# Altium PCB Tracker-NB-IOT-v1.1.PcbDoc (part 2 of 3)
Units mm, origin at the board's own origin, x right, y up, seen from the top; angles counter-clockwise.
Board outline 60 x 36.48 mm, 4 copper layers (Top Layer, Mid Layer 1, Mid Layer 2, Bottom Layer), stack 1.514 mm thick; 117 components, 86 nets, 443 pads, 352 vias.
Unrouted connection lines stored in the file: 3.
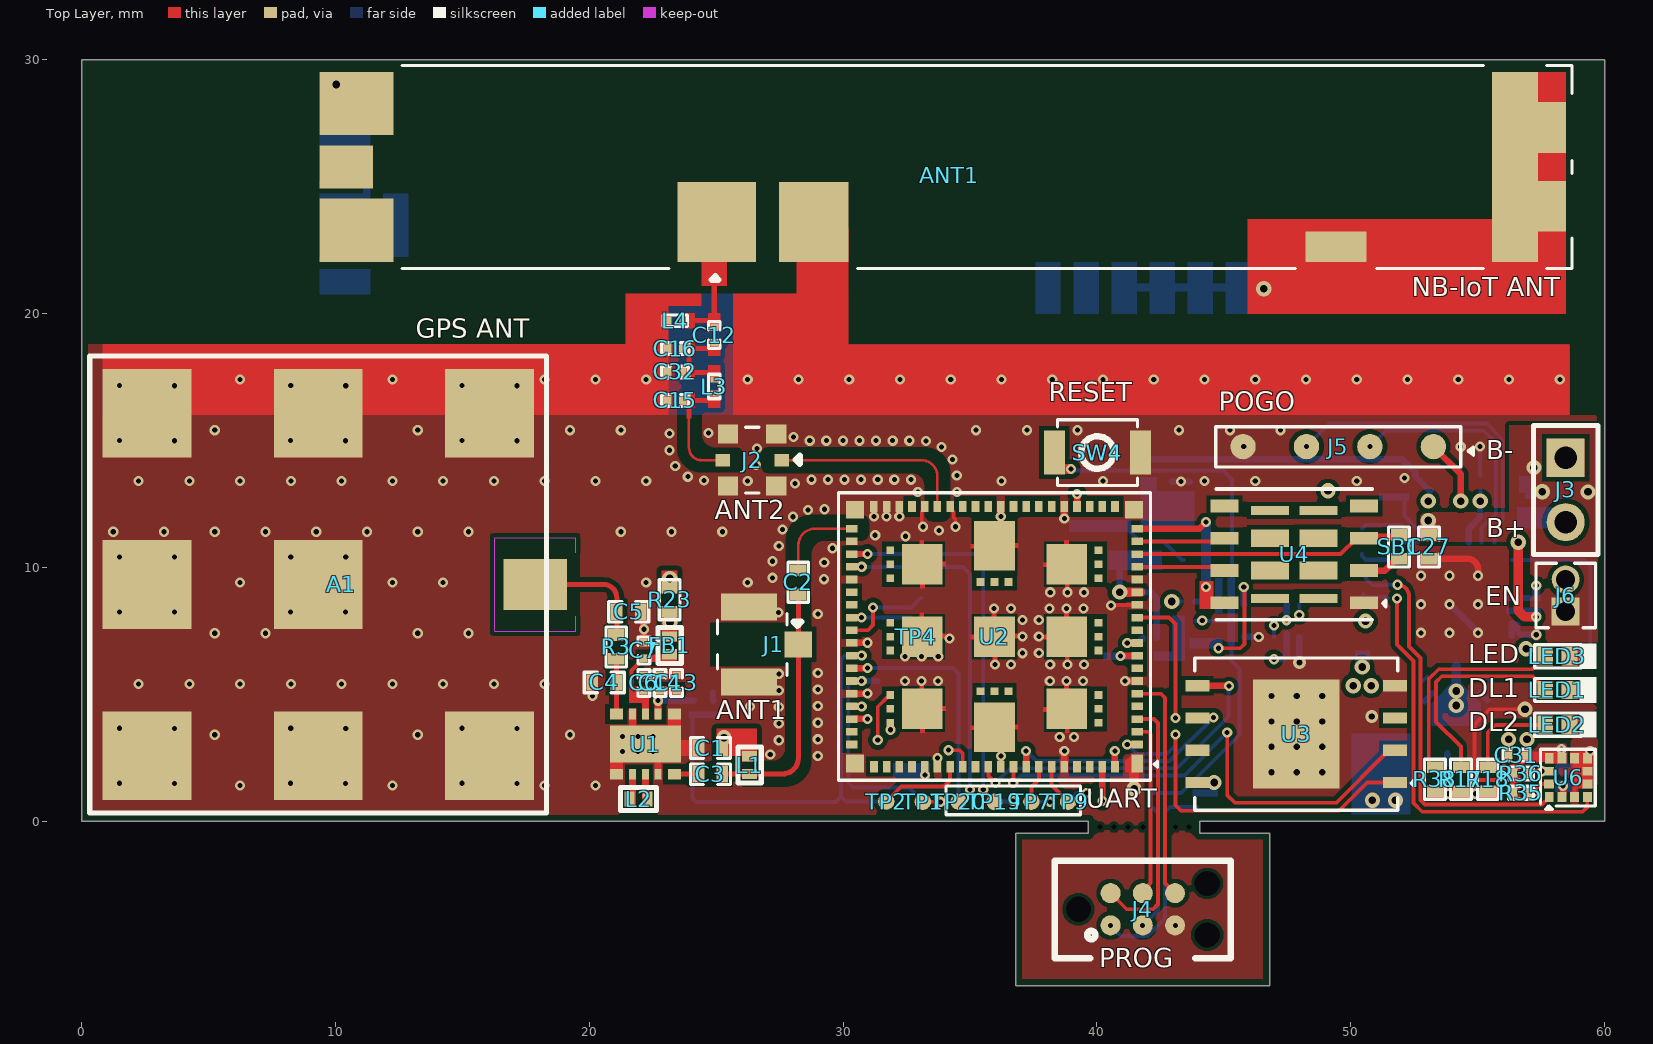
[diagram p0: Top Layer view]

## Part data (continued)
R4 R34: library part RC0201FR-07100KL, "RES 100K OHM 1% 1/20W 0201", Case Code (Imperial)=0201, Case Code (Metric)=0603, LCSC Part Number=C106224, Manufacturer=Yageo, Max Operating Temperature=125°C, Max Power Dissipation=50mW, Min Operating Temperature=-55°C, Package Quantity=10000, Resistance=100kR, Resistance Tolerance=1%, Resistor Type="Thick Film", Supplier Part Number 1=311-100KMCT-ND, Temperature Coefficient=200ppm/°C, Voltage Rating=25V, Case/Package=0201, Category="Chip SMD Resistors", ComponentLink1Description=https://datasheet.ciiva.com/7660/1421516-7660806.pdf?src-supplier=Element14, ComponentLink1URL=https://datasheet.ciiva.com/7660/1421516-7660806.pdf?src-supplier=Element14, ComponentLink2Description=https://datasheet.ciiva.com/22698/1563626-22698495.pdf?src-supplier=Element14, ComponentLink2URL=https://datasheet.ciiva.com/22698/1563626-22698495.pdf?src-supplier=Element14, ComponentLink3Description=https://datasheet.ciiva.com/46391/1421516-46391338.pdf?src-supplier=Element14, ComponentLink3URL=https://datasheet.ciiva.com/46391/1421516-46391338.pdf?src-supplier=Element14, ComponentLink4Description=https://datasheet.ciiva.com/2493/pyu-r-int-thick-7-2493770.pdf?src-supplier=Digi-Key, ComponentLink4URL=https://datasheet.ciiva.com/2493/pyu-r-int-thick-7-2493770.pdf?src-supplier=Digi-Key, ComponentLink5Description=https://datasheet.ciiva.com/2493/pyu-r-int-thick-7-2493771.pdf?src-supplier=Digi-Key, ComponentLink5URL=https://datasheet.ciiva.com/2493/pyu-r-int-thick-7-2493771.pdf?src-supplier=Digi-Key, ComponentLink6Description=https://datasheet.ciiva.com/2493/pyu-r-int-thick-7-2493769.pdf?src-supplier=Digi-Key, ComponentLink6URL=https://datasheet.ciiva.com/2493/pyu-r-int-thick-7-2493769.pdf?src-supplier=Digi-Key, ComponentLink7Description=https://datasheet.ciiva.com/26829/getdatasheetpartid-420441-26829850.pdf?src-supplier=Verical, ComponentLink7URL=https://datasheet.ciiva.com/26829/getdatasheetpartid-420441-26829850.pdf?src-supplier=Verical, Construction=Rectangular, Contact Plating=Tin,Matte, Depth=0.3mm, Features="Moisture Resistant", Height=0.01inch, Item Type=Resistor, Lead Free="Lead Free", Length=0.024inch, Manufacturer Part Number=RC0201FR-07100KL, Military Standard=Not, Number of Pins=2, Number of Terminations=2, Packaging="Tape and Reel", Power Rating=50mW, Pricing 1="1=0.10000, 10=0.03900, 100=0.01570, 1000=0.00705, 2500=0.00612, 5000=0.00506 (USD)", REACH SVHC="No SVHC", RoHS=Yes, RoHS Compliant=Yes, Series=RC, Size Code=0201, Stock 1=6740592, Supplier 1=Digi-Key, Termination=SMD/SMT, Tolerance=1%, Voltage Rating (DC)=25V, Width=0.012inch
R6 R7 R8 R9 R10 R11 R12 R13 R14 R24 R28 R33: library part RC0201JR-070RL, "RES SMD 0 OHM JUMPER 1/20W 0201", Case Code (Imperial)=0201, Case Code (Metric)=0603, LCSC Part Number=C106228, Manufacturer=Yageo, Max Operating Temperature=125°C, Max Power Dissipation=50mW, Min Operating Temperature=-55°C, Package Quantity=10000, Resistance Tolerance=5%, Resistor Type="Thick Film", Supplier Part Number 1=311-0.0NCT-ND, Voltage Rating=25V, Case/Package=0201, Category="Chip SMD Resistors", ComponentLink1Description=https://datasheet.ciiva.com/7672/1563626-7672247.pdf?src-supplier=Element14, ComponentLink1URL=https://datasheet.ciiva.com/7672/1563626-7672247.pdf?src-supplier=Element14, ComponentLink2Description=https://datasheet.ciiva.com/7660/1421516-7660808.pdf?src-supplier=Element14, ComponentLink2URL=https://datasheet.ciiva.com/7660/1421516-7660808.pdf?src-supplier=Element14, ComponentLink3Description=https://datasheet.ciiva.com/7672/1563626-7672248.pdf?src-supplier=Element14, ComponentLink3URL=https://datasheet.ciiva.com/7672/1563626-7672248.pdf?src-supplier=Element14, ComponentLink4Description=https://datasheet.ciiva.com/16855/pyu-rc0201-51-rohs-l-8-16855994.pdf?src-supplier=Avnet+Europe, ComponentLink4URL=https://datasheet.ciiva.com/16855/pyu-rc0201-51-rohs-l-8-16855994.pdf?src-supplier=Avnet+Europe, ComponentLink5Description=https://datasheet.ciiva.com/28419/pyu-rc0201-51-rohs-l-8-28419660.pdf?src-supplier=Avnet+Europe, ComponentLink5URL=https://datasheet.ciiva.com/28419/pyu-rc0201-51-rohs-l-8-28419660.pdf?src-supplier=Avnet+Europe, ComponentLink6Description=https://datasheet.ciiva.com/46391/1421516-46391340.pdf?src-supplier=Element14, ComponentLink6URL=https://datasheet.ciiva.com/46391/1421516-46391340.pdf?src-supplier=Element14, ComponentLink7Description=https://datasheet.ciiva.com/8896/pyu-rc0201-51-rohs-l-8-8896143.pdf?src-supplier=Avnet, ComponentLink7URL=https://datasheet.ciiva.com/8896/pyu-rc0201-51-rohs-l-8-8896143.pdf?src-supplier=Avnet, Construction=Rectangular, Contact Plating=Tin,Matte, Depth=0.3mm, Features="Moisture Resistant", Height=0.01inch, Lead Free="Lead Free", Length=0.6mm, Manufacturer Part Number=RC0201JR-070RL, Military Standard=Not, Number of Terminations=2, Packaging="Tape and Reel", Power Rating=50mW, Pricing 1="1=0.10000, 10=0.03600, 25=0.02640, 50=0.02000, 100=0.01480, 250=0.01128, 500=0.00904, 1000=0.00665, 5000=0.00477 (USD)", Radiation Hardening=No, REACH SVHC=Unknown, Resistance=0R, RoHS=Yes, RoHS Compliant=Yes, Series=RC, Size Code=0201, Stock 1=11079, Supplier 1=Digi-Key, Termination=SMD/SMT, Tolerance=5%, Voltage Rating (DC)=25V, Weight=6E-06oz, Width=0.012inch
R15 R19: library part RC0201FR-071KL, "RES 1K OHM 1% 1/20W 0201", Case Code (Imperial)=0201, Case Code (Metric)=0603, LCSC Part Number=C138165, Manufacturer=Yageo, Max Operating Temperature=125°C, Max Power Dissipation=50mW, Min Operating Temperature=-55°C, Package Quantity=10000, Resistance Tolerance=1%, Resistor Type="Thick Film", Supplier Part Number=311-1KMCT-ND, Temperature Coefficient=200ppm/°C, Voltage Rating=25V, Case/Package=0201, Category="Chip SMD Resistors", ComponentLink1Description=https://datasheet.ciiva.com/7672/1563626-7672204.pdf?src-supplier=Element14, ComponentLink1URL=https://datasheet.ciiva.com/7672/1563626-7672204.pdf?src-supplier=Element14, ComponentLink2Description=https://datasheet.ciiva.com/22698/1563626-22698505.pdf?src-supplier=Element14, ComponentLink2URL=https://datasheet.ciiva.com/22698/1563626-22698505.pdf?src-supplier=Element14, ComponentLink3Description=https://datasheet.ciiva.com/29721/pyu-r-int-thick-7-29721196.pdf?src-supplier=Digi-Key, ComponentLink3URL=https://datasheet.ciiva.com/29721/pyu-r-int-thick-7-29721196.pdf?src-supplier=Digi-Key, ComponentLink4Description=https://datasheet.ciiva.com/29721/pyu-r-int-thick-7-29721195.pdf?src-supplier=Digi-Key, ComponentLink4URL=https://datasheet.ciiva.com/29721/pyu-r-int-thick-7-29721195.pdf?src-supplier=Digi-Key, ComponentLink5Description=https://datasheet.ciiva.com/8896/pyu-rc0201-51-rohs-l-8-8896174.pdf?src-supplier=Avnet, ComponentLink5URL=https://datasheet.ciiva.com/8896/pyu-rc0201-51-rohs-l-8-8896174.pdf?src-supplier=Avnet, Construction=Rectangular, Contact Plating=Tin,Matte, Depth=0.3mm, Features="Moisture Resistant", Height=0.01inch, Item Type=Resistor, Lead Free=5697LeadFree, Length=0.024inch, Manufacturer Part Number=RC0201FR-071KL, Military Standard=Not, Number of Terminations=2, Packaging="Tape and Reel", Power Rating=50mW, Pricing="1=0.1, 10=0.027, 50=0.0172, 100=0.0143, 500=0.00988, 1000=0.00854, 5000=0.00629 (USD)", Reach SVHC Compliant=Unknown, RoHS=Yes, RoHS Compliant=Yes, Series=RC, Stock=5606340, Supplier=Digi-Key, Technology="THICK FILM", Termination=SMD/SMT, Tolerance=1%, Voltage Rating (DC)=25V, Width=0.012inch, Working Voltage=25V
R16: library part RC0402FR-070RL, "RES 0 OHM JUMPER 1/16W 0402", Case Code (Imperial)=0402, Case Code (Metric)=1005, LCSC Part Number=C106231, Manufacturer=Yageo, Max Operating Temperature=155°C, Max Power Dissipation=63mW, Min Operating Temperature=-55°C, Power Rating=62.5mW, Resistance=0R, Resistor Type="Thick Film", Supplier Part Number 1=603-RC0402FR-070RL, Temperature Coefficient=200ppm/°C, Tolerance=1%, Voltage Rating=50V, Case/Package=0402, ComponentLink1Description=https://datasheet.ciiva.com/8896/pyu-rc0402-51-rohs-l-6-8896149.pdf?src-supplier=Avnet, ComponentLink1URL=https://datasheet.ciiva.com/8896/pyu-rc0402-51-rohs-l-6-8896149.pdf?src-supplier=Avnet, ComponentLink2Description=https://datasheet.ciiva.com/16790/pyu-rc0402-51-rohs-l-6-r-16790444.pdf?src-supplier=Future+Electronics, ComponentLink2URL=https://datasheet.ciiva.com/16790/pyu-rc0402-51-rohs-l-6-r-16790444.pdf?src-supplier=Future+Electronics, Contact Plating=Tin,Matte, Features="Moisture Resistant", Height=0.35mm, Item Type=Resistors, Lead Free="Lead Free", Length=1mm, Manufacturer Part Number=RC0402FR-070RL, Mount="Surface Mount", Number of Terminations=2, Packaging="Tape and Reel", Pricing 1="1=0.10000, 10=0.01400, 50=0.01400, 100=0.00600, 1000=0.00300, 5000=0.00200, 10000=0.00100 (USD)", Radiation Hardening=No, RoHS=Yes, RoHS Compliant=Yes, Series=RC, Size Code=0402, Stock 1=8556842, Supplier 1=Mouser, Termination=SMD/SMT, Width=0.5mm
R17 R18 R38: library part RC0402FR-07120RL, "RES 120 OHM 1% 1/16W 0402", Case Code (Imperial)=0402, Case Code (Metric)=1005, LCSC Part Number=C114758, Manufacturer=Yageo, Max Operating Temperature=155°C, Max Power Dissipation=63mW, Min Operating Temperature=-55°C, Package Quantity=1, Power Rating=62.5mW, Resistance Tolerance=1%, Resistor Type="Thick Film", Supplier Part Number=4529079, Temperature Coefficient=100ppm/°C, Voltage Rating=50V, Case/Package=0402, ComponentLink1Description=https://datasheet.ciiva.com/12667/pyu-rc0402-51-rohs-l-6-r-12667958.pdf?src-supplier=Mouser, ComponentLink1URL=https://datasheet.ciiva.com/12667/pyu-rc0402-51-rohs-l-6-r-12667958.pdf?src-supplier=Mouser, ComponentLink2Description=https://datasheet.ciiva.com/7849/1018594-7849831.pdf?src-supplier=Element14, ComponentLink2URL=https://datasheet.ciiva.com/7849/1018594-7849831.pdf?src-supplier=Element14, Construction=Rectangular, Depth=0.5mm, Features="Moisture Resistant", Height=0.016inch, Item Type=Resistors, Lead Free=5697LeadFree, Length=0.039inch, Manufacturer Part Number=RC0402FR-07120RL, Military Standard=Not, Number of Terminations=2, Packaging="Tape and Reel", Pricing="10000=0.0012, 100000=0.0011, 300000=0.001, 750000=0.001, 2000000=0.0009 (USD)", Reach SVHC Compliant=No, RoHS=Yes, RoHS Compliant=Yes, Series=RC, Stock=150000, Supplier="Future Electronics", Technology="THICK FILM", Termination=SMD/SMT, Tolerance=1%, Voltage Rating (AC)=50V, Width=0.02inch
R21 R22: library part RC0201FR-071ML, "RES 1M OHM 1% 1/20W 0201", Case Code (Imperial)=0201, Case Code (Metric)=0603, LCSC Part Number=C295786, Manufacturer=Yageo, Max Operating Temperature=125°C, Max Power Dissipation=50mW, Min Operating Temperature=-55°C, Package Quantity=10000, Resistance Tolerance=1%, Resistor Type="Thick Film", Temperature Coefficient=200ppm/°C, Voltage Rating=25V, Case/Package=0201, ComponentLink1Description=https://datasheet.ciiva.com/29721/pyu-r-int-thick-7-29721005.pdf?src-supplier=Digikey, ComponentLink1URL=https://datasheet.ciiva.com/29721/pyu-r-int-thick-7-29721005.pdf?src-supplier=Digikey, ComponentLink2Description=https://datasheet.ciiva.com/29721/pyu-r-int-thick-7-29721006.pdf?src-supplier=Digikey, ComponentLink2URL=https://datasheet.ciiva.com/29721/pyu-r-int-thick-7-29721006.pdf?src-supplier=Digikey, ComponentLink3Description=https://datasheet.ciiva.com/7672/1563626-7672207.pdf?src-supplier=Element14, ComponentLink3URL=https://datasheet.ciiva.com/7672/1563626-7672207.pdf?src-supplier=Element14, ComponentLink4Description=https://datasheet.ciiva.com/22698/1563626-22698507.pdf?src-supplier=Element14, ComponentLink4URL=https://datasheet.ciiva.com/22698/1563626-22698507.pdf?src-supplier=Element14, ComponentLink5Description=https://datasheet.ciiva.com/25647/pyu-r-int-thick-7-25647311.pdf?src-supplier=Digikey, ComponentLink5URL=https://datasheet.ciiva.com/25647/pyu-r-int-thick-7-25647311.pdf?src-supplier=Digikey, Construction=Rectangular, Contact Plating=Tin,Matte, Depth=0.3mm, Features="Moisture Resistant", Height=0.01inch, Item Type=Resistor, Lead Free=5697LeadFree, Length=0.6mm, Manufacturer Part Number=RC0201FR-071ML, Military Standard=Not, Number of Terminations=2, Packaging="Tape and Reel", Power Rating=50mW, Pricing="1=0.104, 25=0.016, 100=0.008, 250=0.007, 1000=0.006 (USD)", Reach SVHC Compliant=Unknown, RoHS=Yes, RoHS Compliant=Yes, Series=RC, Stock=13025, Supplier=Avnet, Termination=SMD/SMT, Tolerance=1%, Voltage Rating (DC)=25V, Width=0.3mm
R29: library part RT0402BRE0747KL, "RES SMD 47K OHM 0.1% 1/16W 0402", Case Code (Metric)=3668CaseCodeMetric, Case/Package=0402, LCSC Part Number=C853293, Manufacturer=Yageo, Max Operating Temperature=155°C, Max Power Dissipation=63mW, Min Operating Temperature=-55°C, Power Rating=62.5mW, Supplier Part Number=YAG4391CT-ND, Temperature Coefficient=50ppm/°C, Tolerance=0.1%, Voltage Rating=50V, Category="Chip SMD Resistors", ComponentLink1Description=https://datasheet.octopart.com/RT0402BRE0747KL-Yageo-datasheet-169971040.pdf?src-supplier=Future+Electronics, ComponentLink1URL=https://datasheet.octopart.com/RT0402BRE0747KL-Yageo-datasheet-169971040.pdf?src-supplier=Future+Electronics, ComponentLink2Description=http://www.yageo.com/documents/recent/PYu-RT_1-to-0.01_RoHS_L_9.pdf?src-supplier=Digikey, ComponentLink2URL=http://www.yageo.com/documents/recent/PYu-RT_1-to-0.01_RoHS_L_9.pdf?src-supplier=Digikey, ComponentLink3Description=https://www.yageo.com/upload/media/product/productsearch/datasheet/rchip/PYu-RT_1-to-0.01_RoHS_L_12.pdf?src-supplier=Digikey, ComponentLink3URL=https://www.yageo.com/upload/media/product/productsearch/datasheet/rchip/PYu-RT_1-to-0.01_RoHS_L_12.pdf?src-supplier=Digikey, Height=350um, Item Type=Resistor, Lead Free="Lead Free", Length=1mm, Manufacturer Part Number=RT0402BRE0747KL, Number of Terminations=2, Pricing="1=0.16, 10=0.121, 50=0.0958, 100=0.0858, 500=0.06536, 1000=0.05776, 5000=0.0428 (USD)", RoHS=Yes, RoHS Compliant=Yes, Series=RT, Stock=11654, Supplier=Digikey, Voltage Rating (DC)=50V, Width=500um
R30: library part RT0402BRD07150KL, "RES 150K OHM 0.1% 1/16W 0402", LCSC Part Number=C852538, Manufacturer=Yageo, Supplier Part Number=3102901, Category="Chip SMD Resistors", Item Type=Resistor, Manufacturer Part Number=RT0402BRD07150KL, Pricing="10000=0.0218, 20000=0.0213, 30000=0.021, 50000=0.0206, 100000=0.0199 (USD)", RoHS=Yes, RoHS Compliant=Yes, Stock=20000, Supplier="Future Electronics"
R31 R32 R35 R36: library part RC0201FR-074K7L, "RES 4.7K OHM 1% 1/20W 0201", LCSC Part Number=C138135, Manufacturer=Yageo, Supplier Part Number=7537285, Category="Chip SMD Resistors", ComponentLink1Description=https://datasheet.ciiva.com/2493/pyu-r-int-thick-7-2493811.pdf?src-supplier=Digi-Key, ComponentLink1URL=https://datasheet.ciiva.com/2493/pyu-r-int-thick-7-2493811.pdf?src-supplier=Digi-Key, ComponentLink2Description=https://datasheet.ciiva.com/2493/pyu-r-int-thick-7-2493812.pdf?src-supplier=Digi-Key, ComponentLink2URL=https://datasheet.ciiva.com/2493/pyu-r-int-thick-7-2493812.pdf?src-supplier=Digi-Key, ComponentLink3Description=https://datasheet.ciiva.com/2493/pyu-r-int-thick-7-2493813.pdf?src-supplier=Digi-Key, ComponentLink3URL=https://datasheet.ciiva.com/2493/pyu-r-int-thick-7-2493813.pdf?src-supplier=Digi-Key, ComponentLink4Description=https://datasheet.ciiva.com/8892/pyu-rc0201-51-rohs-l-8-8892942.pdf?src-supplier=Avnet, ComponentLink4URL=https://datasheet.ciiva.com/8892/pyu-rc0201-51-rohs-l-8-8892942.pdf?src-supplier=Avnet, ComponentLink5Description=https://datasheet.ciiva.com/7672/1563626-7672233.pdf?src-supplier=Element14, ComponentLink5URL=https://datasheet.ciiva.com/7672/1563626-7672233.pdf?src-supplier=Element14, Item Type=Resistor, Manufacturer Part Number=RC0201FR-074K7L, Pricing="10000=0.0014, 50000=0.0013, 250000=0.0013, 750000=0.0012, 2000000=0.0011 (USD)", RoHS=Yes, Stock=1610000, Supplier="Future Electronics"
SB1: "Solder Bridge ON", Item Type="Solder Bridge", Manufacturer Part Number="Solder Bridge 0402"
SW4: "SWITCH TACTILE SPST-NO 0.05A 12V", Contact Current Rating=50mA, Contact Resistance=100mR, Insulation Resistance=100MR, LCSC Part Number=C231329, Manufacturer=Omron, Max Operating Temperature=70°C, Max Voltage Rating (DC)=12V, Min Operating Temperature=-25°C, Operating Force=1.5N, Package Quantity=1, Ratings="Dust Proof,IP40", Supplier Part Number 1=SW1020DKR-ND, Actuator Length=0.4mm, Actuator Type=Standard, ComponentLink1Description=http://www.farnell.com/datasheets/60838.pdf?src-supplier=Farnell, ComponentLink1URL=http://www.farnell.com/datasheets/60838.pdf?src-supplier=Farnell, ComponentLink2Description=http://www.farnell.com/datasheets/60838.pdf?src-supplier=Element14, ComponentLink2URL=http://www.farnell.com/datasheets/60838.pdf?src-supplier=Element14, ComponentLink3Description=https://omronfs.omron.com/en_US/ecb/products/pdf/en-b3u.pdf?src-supplier=Digi-Key, ComponentLink3URL=https://omronfs.omron.com/en_US/ecb/products/pdf/en-b3u.pdf?src-supplier=Digi-Key, ComponentLink4Description=http://www.omron.com/ecb/products/pdf/en-b3u.pdf?src-supplier=Digi-Key, ComponentLink4URL=http://www.omron.com/ecb/products/pdf/en-b3u.pdf?src-supplier=Digi-Key, ComponentLink5Description=https://www.distrelec.biz/Web/Downloads/he/et/B3U_eng_datasheet.pdf?mime=application%2Fpdf&src-supplier=Distrelec, ComponentLink5URL=https://www.distrelec.biz/Web/Downloads/he/et/B3U_eng_datasheet.pdf?mime=application%2Fpdf&src-supplier=Distrelec, ComponentLink6Description=http://www.onlinecomponents.com/productFiles/mf-OM/en-b3u.pdf?src-supplier=Onlinecomponents.com, ComponentLink6URL=http://www.onlinecomponents.com/productFiles/mf-OM/en-b3u.pdf?src-supplier=Onlinecomponents.com, ComponentLink7Description=https://www.verical.com/server-webapp/html/getDatasheet?partID=552554&src-supplier=Verical, ComponentLink7URL=https://www.verical.com/server-webapp/html/getDatasheet?partID=552554&src-supplier=Verical, ComponentLink8Description=http://www.farnell.com/datasheets/1685550.pdf?src-supplier=Element14, ComponentLink8URL=http://www.farnell.com/datasheets/1685550.pdf?src-supplier=Element14, ComponentLink9Description=http://www.farnell.com/datasheets/2610940.pdf?src-supplier=Farnell, ComponentLink9URL=http://www.farnell.com/datasheets/2610940.pdf?src-supplier=Farnell, ComponentLink10Description=https://www.alliedelec.com/m/d/4c8a9ef82804fc3c241a13c1e298fd73.pdf?src-supplier=Allied+Electronics, ComponentLink10URL=https://www.alliedelec.com/m/d/4c8a9ef82804fc3c241a13c1e298fd73.pdf?src-supplier=Allied+Electronics, Contact Material=Silver, Current Rating=50mA, Depth=2.5mm, Electrical Life=200000Cycles, Height=1.2mm, Illumination Type=Non-Illuminated,Illuminated, Item Type=Switch, Lead Free="Lead Free", Length=4mm, Manufacturer Part Number=B3U-1000P, Max Current Rating=50mA, Mechanical Life=200000Cycles, Mount="Surface Mount", Orientation=Straight, Packaging="Tape and Reel", Pricing 1="1=1, 10=0.961, 25=0.9064, 50=0.7976, 100=0.7251, 250=0.68888, 500=0.67074, 1000=0.52571 (USD)", REACH SVHC=Unknown, Stock 1=116454, Supplier 1=Digi-Key, Switch Function=Off-Mom, Switch Travel=0.15mm, Termination=SMD/SMT, Throw Configuration=SPST, Voltage Rating (DC)=12V, Weight=0.000776oz, Width=3mm
TP1 TP2 TP3 TP4 TP5 TP6 TP7 TP9 TP11 TP12 TP13 TP18 TP19 TP20 TP21 TP22 TP23 TP24: "Test Point ON", Item Type="Test Point", Manufacturer Part Number="TEST POINT 0.5mm Dia"
U1: "GNSS Low-Noise Amplifier Front-End Module with Integrated Pre-Filter and Post-Filter", Manufacturer=Skyworks, Supplier Part Number 1=863-2032-1-ND, Author=rsk, ComponentLink1Description=Datasheet, ComponentLink1URL=http://www.skyworksinc.com/uploads/documents/SKY65943_11_204404F.pdf, ComponentLink2Description="Supplier link", ComponentLink2URL=https://www.digikey.com/product-detail/en/skyworks-solutions-inc/SKY65943-11/863-2032-1-ND, Footprint Doc=MCM-10, HelpURL=http://www.skyworksinc.com/Product/3579/SKY65943-11, Item Type=Module, LatestRevisionDate=2019-04-16, Manufacturer Part Number=SKY65943-11, Note=N.A., Published=2019-04-16, Supplier 1=Digi-Key, Supplier 2=Mouser, Supplier Part Number 2=873-SKY65943-11
U2: "IC RF TXRX + MCU CELL", Manufacturer="Nordic Semiconductor", Part Number=nRF9151-LACAA0A, Part number IPS=N.A., Artikkelnr Noca=N.A., Author=kod1, Component Class=Nordic_Devices, Component Status=Active, ComponentLink1Description=Datasheet, ComponentLink1URL=N.A., ComponentLink2Description="Supplier link", ComponentLink2URL=N.A., Footprint Doc=LGA-113, HelpURL=N.A., LatestRevisionDate=2024-04-29, Manufacturer Part Number=NRF9151-LACA-R, Note=N.A., Pad Count=113, Part number Norautron=N.A., Published=2024-04-29, Supplier 1="Nordic Semiconductor", Supplier 2=N.A., Supplier Part Number 1=nRF9151-LACAA0A, Supplier Part Number 2=N.A.
U3: "IC FLASH 256MBIT SPI/QUAD 8WSON", Manufacturer=GigaDevice, Supplier Part Number=1970-GD25WB256EYIGY-ND, Item Type=IC, Manufacturer Part Number=GD25WB256EYIGY, RoHS=No, Supplier=Digikey
U4: "E-SIM IC", Manufacturer=-, Package=MFFX, Item Type=IC, Manufacturer Part Number="MFFX-M2M UICC"
U5: "PMIC (POWER MANAGEMENT IC) WITH", Manufacturer="Nordic Semiconductor", Supplier Part Number=4823-NPM1300-QEAA-RCT-ND, Item Type=IC, Manufacturer Part Number=NPM1300-QEAA-R, Pricing="1=4.13, 100=3.23, 500=2.55, 1000=2.22001 (USD)", RoHS=No, Stock=2826, Supplier=Digikey
U6: "ACCEL 2-16G I2C/SPI 12LGA", LCSC Part Number=C110926, Manufacturer=STMicroelectronics, Operating Supply Voltage=2.5V, ComponentLink1Description=https://datasheet.ciiva.com/46423/1836729-46423946.pdf?src-supplier=Element14, ComponentLink1URL=https://datasheet.ciiva.com/46423/1836729-46423946.pdf?src-supplier=Element14, Item Type=Sensor, Lead Free=5697LeadFree, Manufacturer Part Number=LIS2DH12TR, Pricing="8000=0.9 (USD)", RoHS=Yes, Stock=64000, Supplier="Future Electronics"

## Free pads (board coordinates)
  round 0 hole 0.2 unplated: 1(40.116,-0.238) 1(40.673,-0.238) 1(41.231,-0.238) 1(41.814,-0.238) 1(43.089,-0.238) 1(43.621,-0.238)

## Via types
v1: diameter 0.4, hole 0.2, Top Layer to Bottom Layer, tented both sides, 308 vias
v2: diameter 0.6, hole 0.3, Top Layer to Bottom Layer, tented both sides, 30 vias
v3: diameter 0.5, hole 0.25, Top Layer to Bottom Layer, tented both sides, 14 vias

## Nets (pads, with @x,y where several pads share a name; then routed paths per layer and width w, separated by ;. In a path a pad name is that pad's centre, name@x,y a point inside that pad or via, vN(x,y) a via of type N, cw(c..) or ccw(c..) an arc to the next point about the centre after c; other vN are vias at no path point)
ANT: C15.2 J2.2 L3.1 | length 3.5
  Top Layer w0.101: 23.922,16.58 23.922,14.721 ccw(c24.42,14.721) 24.42,14.224 J2.2@25.256,14.224
BUTTON1: TP2.1 U2.67 | length 3.4
  Top Layer w0.152: TP2.1@31.698,0.773 32.29,1.365 33.969,1.365 34.213,1.608 U2.67@34.213,2.148
BUTTON2: TP1.1 U2.68 | length 4
  Top Layer w0.152: TP1.1@33.136,0.772 33.142,0.765 33.838,0.765 v1(33.84,0.763) ; v1(34.147,2.796) 34.588,2.796 34.713,2.671 U2.68@34.713,2.148
  Mid Layer 2 w0.152: v1(33.84,0.763) 34.161,1.083 34.161,2.782 v1(34.147,2.796)
CC1: J5.2 U5.23 | length 9.6
  Bottom Layer w0.152: v1(50.756,14.758) 51.383,15.386 55.242,15.386 55.712,14.915 55.712,12.103 55.159,11.55 U5.23@55.159,10.98
CC2: J5.3 U5.24 | length 12.6
  Bottom Layer w0.152: v1(48.257,14.759) 49.163,15.665 55.358,15.665 55.992,15.031 55.992,11.887 55.658,11.554 U5.24@55.658,10.98
COEX0: R15.1 R21.2 TP11.1 U2.52 | length 17.8
  Top Layer w0.254: U2.52@30.338,6.523 v1(30.73,6.522)
  Bottom Layer w0.152: R15.1@24.117,4.191 24.063,4.137 24.063,0.895 24.199,0.759 29.715,0.759 29.921,0.965 ; v1(30.73,6.522) 30.069,6.522 29.921,6.374 29.921,0.965 ; TP11.1@31.698,0.773 30.113,0.773 29.921,0.965
COEX1: TP12.1 U2.53 | length 9.3
  Top Layer w0.254: U2.53@30.338,6.023 30.342,6.027 30.957,6.027 v1(30.961,6.031)
  Bottom Layer w0.152: v1(30.961,6.031) 34.333,6.031 34.55,5.813 TP12.1@34.55,0.771
COEX2: R22.2 TP13.1 U2.54 | length 8.7
  Top Layer w0.254: U2.54@30.338,5.523 v1(30.73,5.522)
  Bottom Layer w0.152: v1(30.73,5.522) 30.317,5.522 30.201,5.405 30.201,1.512 30.392,1.32 32.588,1.32 TP13.1@33.14,0.768
  Bottom Layer w0.254: v1@30.73,5.522 R22.2@31.342,5.523
DEC0: C19.2 U2.24 | length 0.7
  Top Layer w0.152: U2.24@39.213,12.398 U2.24@39.218,12.402
  Top Layer w0.254: U2.24@39.218,12.402 v1@39.218,12.788
  Bottom Layer w0.152: C19.2@39.218,12.572 v1(39.218,12.889)
GND: A1.2 ANT1.2 C1.1 C4.2 C5.2 C6.1 C7.1 C8.1 C9.1 C10.1 C11.1 C13.1 C14.1 C15.1 C16.1 C17.1 C18.1 C19.1 C20.1 C21.1 C22.1 C23.1 C24.1 C25.1 C26.1 C27.1 C28.1 C29.1 C30.1 C31.1 C32.1 J1.2 J1.3 J2.3 J3.1 J4.5 J5.4 L4.1 Q1.1 Q2.2 Q3.1 Q3.4 R21.1 R22.1 R24.1 R29.1 R30.1 SW4.2 TP4.1 U1.1 U1.4 U1.6 U1.9 U1.11 U2.1 U2.7 U2.13 U2.15 U2.20 U2.25 U2.30 U2.34 U2.36 U2.38 U2.39 U2.40 U2.41 U2.43 U2.46 U2.51 U2.55 U2.60 U2.66 U2.71 U2.76 U2.105 U2.106 U2.107 U2.108 U2.109 U2.110 U2.111 U2.112 U2.113 U3.4 U3.9 U4.1 U5.2 U5.6 U5.30 U5.31 U5.33 U6.3 U6.5 U6.6 U6.7 U6.8 | length 35.5
  Top Layer w0.152: v1(33.144,11.602) 33.097,11.648 33.097,12.207 33.213,12.323 U2.36@33.213,12.398 ; U2.34@34.213,12.398 34.213,12.323 34.36,12.176 34.36,11.959 34.418,11.901 34.418,11.604 v1(34.42,11.602) ; v1(40.551,8.504) 40.56,8.513 41.579,8.513 U2.13@41.588,8.522 ; U2.1@41.463,2.147 U2.1@41.588,2.273 ; U3.9@47.854,3.429 47.854,3.71 U3.9@49.477,5.334 ; U3.4@51.742,5.341 U3.4@51.749,5.334 ; C31.1@56.231,2.603 56.029,2.4 56.029,1.791 55.861,1.623 55.061,1.623 54.877,1.808 54.877,3.811 55.473,4.407 v2(56.868,4.407) ; U6.3@58.822,0.958 U6.8@58.822,2.478
  Top Layer w0.254: v1(20.117,4.932) C4.2@20.117,5.466 ; C5.2@22.022,8.254 22.118,8.157 22.118,7.591 v1(22.146,7.563) C7.1@22.146,7.027 ; C6.1@22.146,5.747 22.149,5.75 22.469,5.75 v1(22.472,5.752) ; U2.55@30.338,5.023 30.342,5.027 30.957,5.027 v1(30.961,5.031) ; U2.51@30.338,7.023 30.342,7.027 30.957,7.027 v1(30.961,7.031) ; U2.46@30.338,9.523 U2.46@30.342,9.527 ; v1@31.213,12.006 U2.40@31.213,12.398 ; v1@31.713,12.006 U2.39@31.713,12.398 ; v1@32.213,12.006 U2.38@32.213,12.398 ; U2.66@33.713,2.148 33.714,2.149 33.714,2.493 v1(33.715,2.494) ; U2.71@36.213,2.148 v1(36.213,2.562) ; v1@36.213,12.006 U2.30@36.213,12.398 ; U2.76@38.713,2.148 v1(38.713,2.771) ; v1@38.713,11.931 U2.25@38.713,12.398 ; v1(41.113,5.522) U2.7@41.588,5.522 ; J4.5@43.078,-4.106 43.087,-4.115 v1(43.089,-4.115) ; C27.1@53.059,10.335 C27.1@53.084,10.335 54.61,10.335 cw(c54.61,9.928) 55.017,9.928 v1(55.017,9.669)
  Top Layer w0.381: v2(41.463,1.279) U2.1@41.463,2.147
  Bottom Layer w0.152: C11.1@40.898,11.811 40.962,11.811 41.267,11.506 41.267,11.443 41.693,11.017 42.615,11.017 43.345,10.287 C10.1@43.409,10.287 ; Q3.1@47.97,7.253 Q3.1@47.976,7.247 ; v3@47.976,6.208 v3@47.982,6.202 ; R24.1@52.112,13.319 v1(52.112,13.527) ; v1(54.333,14.752) 54.334,14.751 54.334,13.625 C22.1@54.336,13.624 ; v1(55.094,14.758) 55.1,14.752 55.1,13.63 C23.1@55.107,13.624
  Bottom Layer w0.254: 24.868,5.066 24.87,5.063 24.87,4.743 R21.1@24.873,4.741 ; C9.1@42.948,13.373 C8.1@43.659,13.373 ; Q1.1@45.796,7.253 45.801,7.258 46.371,7.258 v1(46.377,7.263) ; v3@47.976,6.208 Q3.1@47.976,7.247 ; U5.33@53.909,8.545 U5.33@54.913,7.54 ; U5.31@56.343,7.295 U5.30@56.343,7.795 U5.30@56.381,7.795 ; U5.30@56.565,7.741 56.565,7.508 56.727,7.345 v1(57.309,7.345)
  other v1: 6.238,1.405 12.238,1.405 18.238,1.405 20.238,1.405 1.478,1.493 3.646,1.49 8.228,1.493 10.396,1.49 14.978,1.493 17.146,1.49 29.001,2.571 27.128,2.628 21.308,2.738 21.908,2.738 22.508,2.738 59.438,2.759 27.464,3.19 29.001,3.225 21.308,3.338 21.908,3.338 22.508,3.338 38.532,3.318 39.094,3.318 5.238,3.405 13.238,3.405 19.238,3.405 1.481,3.661 3.649,3.658 8.231,3.661 10.399,3.658 14.981,3.661 17.149,3.658 27.464,3.844 29.001,3.879 27.464,4.498 26.33,4.523 29.001,4.533 27.464,5.152 29.001,5.187 2.238,5.405 4.238,5.405 6.238,5.405 8.238,5.405 10.238,5.405 12.238,5.405 14.238,5.405 16.238,5.405 18.238,5.405 32.436,5.527 33.089,5.527 33.741,5.527 38.143,5.528 38.796,5.528 39.448,5.528 27.464,5.806 29.001,5.841 35.987,6.168 36.614,6.168 38.158,6.168 38.836,6.168 39.489,6.168 32.442,6.49 33.095,6.49 33.747,6.49 37.067,6.619 37.709,6.622 34.188,7.201 37.067,7.271 37.709,7.274 5.238,7.405 7.238,7.405 13.238,7.405 15.238,7.405 52.77,7.421 53.893,7.421 55.017,7.421 37.067,7.924 37.709,7.926 29.001,8.165 1.478,8.243 3.646,8.24 8.228,8.243 10.396,8.24 27.456,8.22 35.939,8.377 36.617,8.377 38.136,8.377 38.8,8.374 39.467,8.377 52.77,8.545 53.893,8.545 55.017,8.545 38.159,9.018 38.837,9.018 39.489,9.018 6.238,9.405 12.238,9.405 14.238,9.405 22.238,9.405 26.238,9.405 29.248,9.534 27.209,9.589 52.77,9.669 53.893,9.669 29.254,10.188 27.218,10.243 1.481,10.411 3.649,10.408 8.231,10.411 10.399,10.408 29.581,10.754 27.464,10.849 32.462,11.227 31.263,11.265 1.238,11.405 3.238,11.405 5.238,11.405 7.238,11.405 9.238,11.405 11.238,11.405 13.238,11.405 15.238,11.405 21.238,11.405 23.238,11.405 25.238,11.405 33.782,11.458 27.606,11.487 38.714,11.93 28.02,11.994 31.212,12.005 31.712,12.005 32.212,12.005 36.212,12.005 28.615,12.264 29.269,12.291 32.941,12.972 34.484,12.972 28.108,13.308 43.317,13.385 2.238,13.405 4.238,13.405 6.238,13.405 8.238,13.405 10.238,13.405 12.238,13.405 14.238,13.405 16.238,13.405 18.238,13.405 20.238,13.405 22.238,13.405 26.238,13.405 36.238,13.405 40.238,13.405 44.238,13.405 46.238,13.405 50.238,13.405 24.516,13.427 28.746,13.455 29.4,13.455 30.054,13.455 30.708,13.455 31.362,13.455 32.016,13.455 32.67,13.455 23.878,13.573 34.478,13.626 23.383,14.001 26.572,14.037 34.308,14.257 23.158,14.615 26.609,14.69 33.871,14.744 45.783,14.758 1.478,14.993 3.646,14.99 8.228,14.993 10.396,14.99 14.978,14.993 17.146,14.99 28.682,14.993 29.336,14.993 29.99,14.993 30.644,14.993 31.298,14.993 31.952,14.993 32.606,14.993 33.26,14.977 28.045,15.14 23.153,15.269 24.691,15.301 5.238,15.405 13.238,15.405 19.238,15.405 21.238,15.405 35.238,15.405 37.238,15.405 39.238,15.405 43.238,15.405 45.238,15.405 47.238,15.405 3.649,17.158 10.399,17.158 17.149,17.158 1.481,17.161 8.231,17.161 14.981,17.161 6.238,17.405 12.238,17.405 18.238,17.405 20.238,17.405 22.238,17.405 26.238,17.405 28.238,17.405 30.238,17.405 32.238,17.405 34.238,17.405 36.238,17.405 38.238,17.405 40.238,17.405 42.238,17.405 44.238,17.405 46.238,17.405 48.238,17.405 50.238,17.405 52.238,17.405 54.238,17.405 56.238,17.405 58.238,17.405
  other v3: 46.879,1.929 47.879,1.929 48.879,1.929 46.879,2.929 47.879,2.929 48.879,2.929 46.879,3.929 47.879,3.929 48.879,3.929 50.824,4.122 46.879,4.929 47.879,4.929 48.879,4.929 47.982,6.252
GPS_RF1: C2.1 U2.42 | length 3.4
  Top Layer w0.101: C2.1@28.232,9.881 28.232,10.872 cw(c28.882,10.872) 28.882,11.523 U2.42@30.297,11.523
GPS_RF2: C2.2 C3.2 J1.1 L1.1 | length 9.8
  Top Layer w0.2: C3.2@25.241,1.85 L1.1@26.314,1.85 ; L1.1@26.314,1.86 27.613,1.86 ccw(c27.613,2.479) 28.232,2.479 J1.1@28.232,6.964 C2.2@28.232,8.942
GPS_RF3: C3.1 U1.10 | length 1
  Top Layer w0.2: U1.10@23.351,1.85 C3.1@24.302,1.85
GPS_RF4: C4.1 R3.1 U1.5 | length 2.2
  Top Layer w0.2: U1.5@21.064,4.225 R3.1@21.064,6.395
GPS_RF5: A1.1 C5.1 R3.2 | length 5
  Top Layer w0.2: A1.1@17.864,9.326 20.557,9.326 cw(c20.557,8.801) 21.082,8.801 R3.2@21.082,7.36
INT1: R35.2 U2.79 U6.12 | length 20.2
  Top Layer w0.152: R35.2@56.984,1.117 56.992,1.125 57.184,1.125 v1(57.192,1.132) ; v1@57.199,1.14 57.199,1.189 57.473,1.463 57.807,1.463 U6.12@57.812,1.468
  Top Layer w0.254: v1(40.213,0.794) U2.79@40.213,2.148
  Mid Layer 2 w0.152: v1(40.213,0.794) 40.564,0.443 49.491,0.443 50.732,1.684 56.64,1.684 v1(57.192,1.132)
INT2: R36.2 U2.80 U6.11 | length 20.8
  Top Layer w0.152: R36.2@56.984,1.878 56.984,1.919 57.043,1.978 v1@57.521,1.978 ; v1(57.531,1.968) U6.11@57.812,1.968
  Top Layer w0.254: v1(40.704,2.771) 40.709,2.767 40.709,2.152 U2.80@40.713,2.148
  Mid Layer 2 w0.152: v1(40.704,2.771) 40.704,0.868 40.85,0.722 49.375,0.722 50.621,1.968 v1(57.531,1.968)